# Altium PCB TabletDesign.PcbDoc (part 3 of 3)
Units mm, origin at the board's own origin, x right, y up, seen from the top; angles counter-clockwise.
Board outline 140 x 100 mm, 2 copper layers (Top Layer, Bottom Layer); 256 components, 248 nets, 1066 pads, 0 vias.
Unrouted connection lines stored in the file: 625.
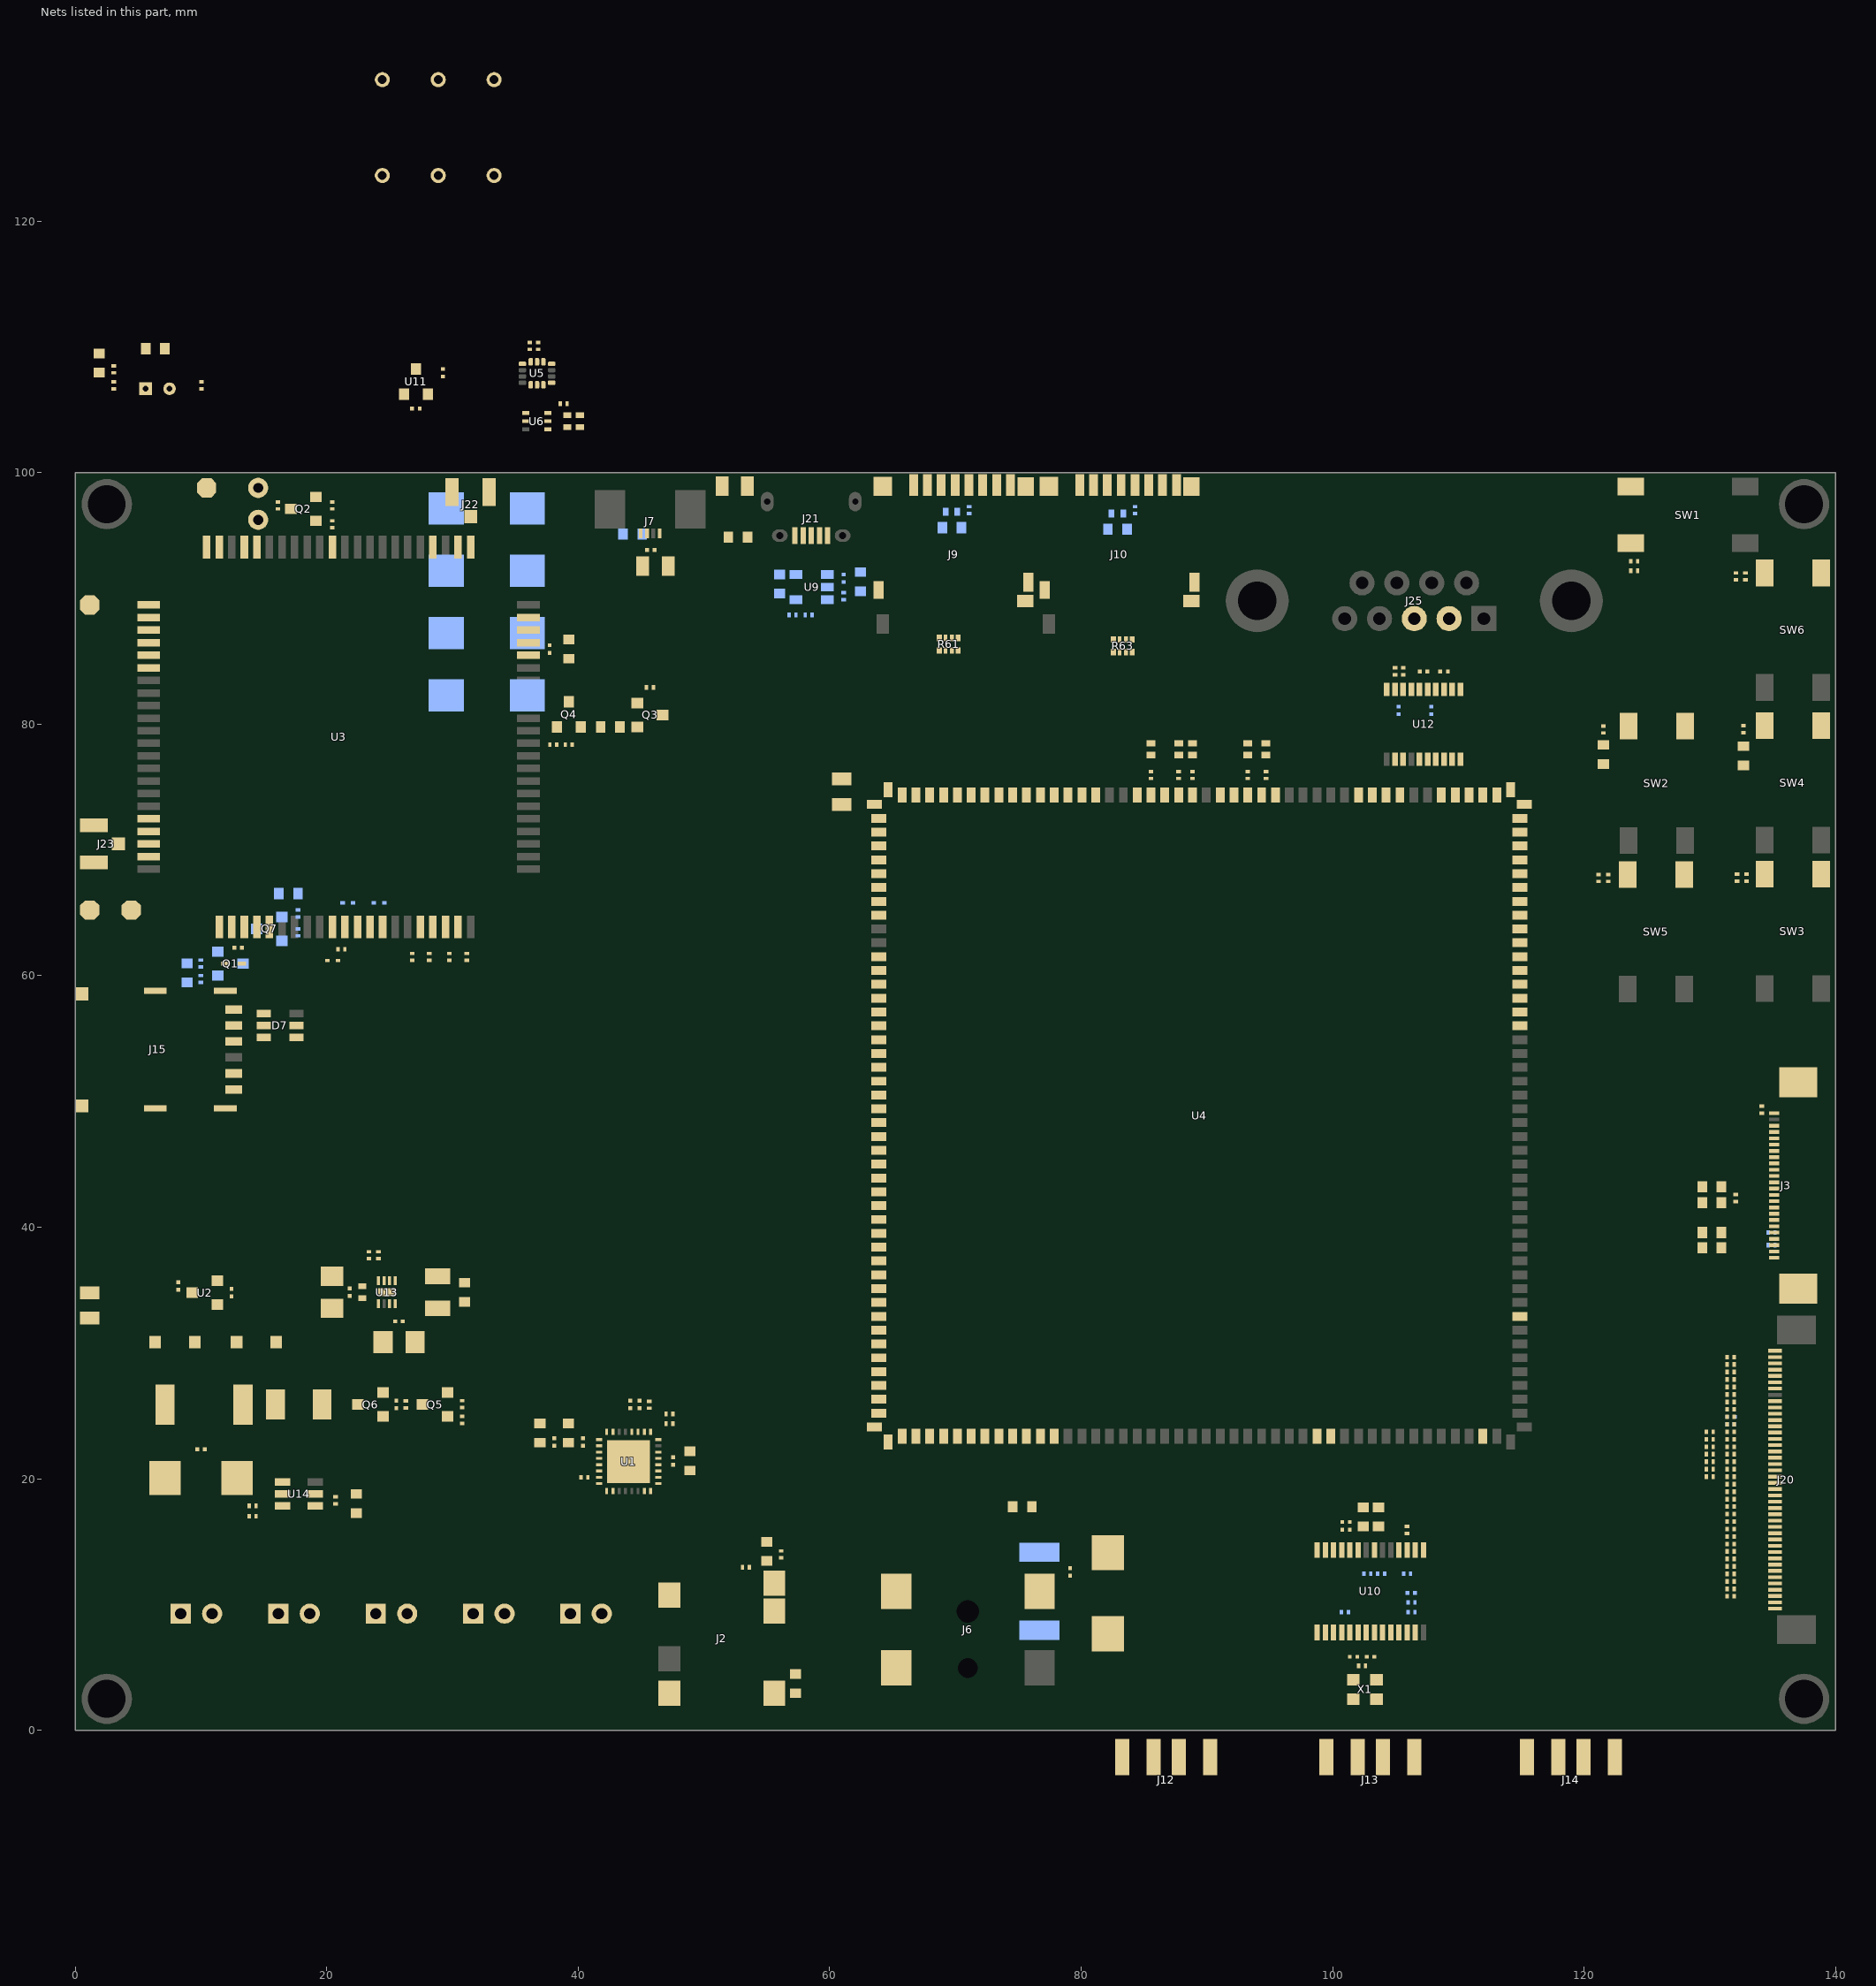
[diagram p2: the nets of this part, all layers, seen from the top]

## Part data (continued)
R1 R3 R71: library part RC0201JR-07680RL, "RES SMD 680 OHM 5% 1/20W 0201", Case Code (Imperial)=0201, Case Code (Metric)=0603, Manufacturer=Yageo, Max Operating Temperature=125°C, Max Power Dissipation=50mW, Min Operating Temperature=-55°C, Resistance Tolerance=5%, Resistor Type="Thick Film", Supplier Part Number 1=311-680NCT-ND, Temperature Coefficient=200ppm/°C, Voltage Rating=25V, Case/Package=0201, Category="Chip SMD Resistors", ComponentLink1Description=https://datasheet.ciiva.com/8884/pyu-rc0201-51-rohs-l-8-8884997.pdf?src-supplier=Avnet, ComponentLink1URL=https://datasheet.ciiva.com/8884/pyu-rc0201-51-rohs-l-8-8884997.pdf?src-supplier=Avnet, ComponentLink2Description=https://datasheet.ciiva.com/28388/pyu-rc0201-51-rohs-l-8-28388585.pdf?src-supplier=Avnet+Europe, ComponentLink2URL=https://datasheet.ciiva.com/28388/pyu-rc0201-51-rohs-l-8-28388585.pdf?src-supplier=Avnet+Europe, ComponentLink3Description=https://datasheet.ciiva.com/7672/1563626-7672300.pdf?src-supplier=Element14, ComponentLink3URL=https://datasheet.ciiva.com/7672/1563626-7672300.pdf?src-supplier=Element14, ComponentLink4Description=https://datasheet.ciiva.com/7672/1563626-7672299.pdf?src-supplier=Element14, ComponentLink4URL=https://datasheet.ciiva.com/7672/1563626-7672299.pdf?src-supplier=Element14, ComponentLink5Description=https://datasheet.ciiva.com/16855/pyu-rc0201-51-rohs-l-8-16855612.pdf?src-supplier=Avnet+Europe, ComponentLink5URL=https://datasheet.ciiva.com/16855/pyu-rc0201-51-rohs-l-8-16855612.pdf?src-supplier=Avnet+Europe, Construction=Rectangular, Contact Plating=Tin,Matte, Depth=0.3mm, Features="Moisture Resistant", Length=0.6mm, Manufacturer Part Number=RC0201JR-07680RL, Military Standard=Not, Number of Pins=2, Number of Terminations=2, Packaging="Cut Tape", Power Rating=50mW, Pricing 1="1=0.10000, 10=0.02800, 100=0.01140, 1000=0.00513, 2500=0.00445, 5000=0.00368 (USD)", Radiation Hardening=No, REACH SVHC="No SVHC", Resistance=680R, RoHS=Yes, RoHS Compliant=Yes, Series=RC, Stock 1=10382, Supplier 1=Digi-Key, Tolerance=5%, Voltage Rating (DC)=25V, Width=0.3mm
R2: library part RC0201FR-075K6L, "RES SMD 5.6K OHM 1% 1/20W 0201", Case Code (Imperial)=0201, Case Code (Metric)=0603, Manufacturer=Yageo, Max Operating Temperature=125°C, Max Power Dissipation=50mW, Min Operating Temperature=-55°C, Package Quantity=10000, Resistance=5.6kR, Resistance Tolerance=1%, Resistor Type="Thick Film", Supplier Part Number 1=YAG2346CT-ND, Temperature Coefficient=200ppm/°C, Voltage Rating=25V, Case/Package=0201, Category="Chip SMD Resistors", ComponentLink1Description=https://datasheet.ciiva.com/22661/1563626-22661325.pdf?src-supplier=Element14, ComponentLink1URL=https://datasheet.ciiva.com/22661/1563626-22661325.pdf?src-supplier=Element14, Features="Moisture Resistant", Height=0.01inch, Length=0.024inch, Manufacturer Part Number=RC0201FR-075K6L, Number of Terminations=2, Packaging="Tape and Reel", Power Rating=50mW, Pricing 1="1=0.10000, 10=0.04000, 100=0.01630, 1000=0.00732, 2500=0.00635, 5000=0.00525 (USD)", REACH SVHC="No SVHC", RoHS=Yes, RoHS Compliant=Yes, Series=RC, Stock 1=2, Supplier 1=Digi-Key, Termination=SMD/SMT, Tolerance=1%, Width=0.012inch
R4 R5 R25 R26 R29 R30 R32 R33 R35 R37 R60 R62 R83 R84 R117 R119: library part AC0201FR-07100RL, "RES SMD 100 OHM 1% 1/20W 0201", Case Code (Imperial)=0201, Case Code (Metric)=0603, Manufacturer=Yageo, Max Operating Temperature=155°C, Max Power Dissipation=50mW, Min Operating Temperature=-55°C, Resistor Type="Thick Film", Supplier Part Number 1=YAG3412CT-ND, Temperature Coefficient=200ppm/°C, Tolerance=1%, Case/Package=0201, Category="Chip SMD Resistors", ComponentLink1Description=http://www.yageo.com/NewPortal/yageodocoutput?fileName=/pdf/R-Chip/PYu-AC_51_RoHS_L_6.pdf&src-supplier=Digi-Key, ComponentLink1URL=http://www.yageo.com/NewPortal/yageodocoutput?fileName=/pdf/R-Chip/PYu-AC_51_RoHS_L_6.pdf&src-supplier=Digi-Key, Features="Moisture Resistant,Automotive AEC-Q200", Height=0.01inch, Length=0.024inch, Manufacturer Part Number=AC0201FR-07100RL, Number of Terminations=2, Packaging="Tape and Reel", Pricing 1="1=0.10000, 10=0.06300, 100=0.02560, 1000=0.01149, 2500=0.00997, 5000=0.00823 (USD)", Resistance=100R, RoHS=Yes, RoHS Compliant=Yes, Stock 1=124190, Supplier 1=Digi-Key, Width=0.012inch
R6 R24 R81: library part RC0201JR-070RL, "RES SMD 0 OHM JUMPER 1/20W 0201"
R7 R8 R9 R15 R17 R28 R31 R34 R36 R39 R69 R74 R89 R91 R93 R95 R97 R99 R101 R103 R131: library part RC0201FR-0710KL, "RES SMD 10K OHM 1% 1/20W 0201", Case Code (Imperial)=0201, Case Code (Metric)=0603, Manufacturer=Yageo, Max Operating Temperature=125°C, Max Power Dissipation=50mW, Min Operating Temperature=-55°C, Package Quantity=1, Resistance=10kR, Supplier Part Number 1=311-10.0KMCT-ND, Temperature Coefficient=200ppm/°C, Tolerance=1%, Voltage Rating=25V, Case/Package=0201, ComponentLink1Description=http://www.yageo.com/documents/recent/PYu-RC_Group_51_RoHS_L_10.pdf?src-supplier=Digi-Key, ComponentLink1URL=http://www.yageo.com/documents/recent/PYu-RC_Group_51_RoHS_L_10.pdf?src-supplier=Digi-Key, ComponentLink2Description=http://www.farnell.com/datasheets/2167052.pdf?src-supplier=Element14, ComponentLink2URL=http://www.farnell.com/datasheets/2167052.pdf?src-supplier=Element14, ComponentLink3Description=http://www.yageo.com/documents/recent/PYu-RC0201_51_RoHS_L_8.pdf?src-supplier=Avnet, ComponentLink3URL=http://www.yageo.com/documents/recent/PYu-RC0201_51_RoHS_L_8.pdf?src-supplier=Avnet, ComponentLink4Description=http://www.yageo.com/documents/recent/PYu-RC0201_51_RoHS_L_8.pdf?src-supplier=Avnet+Europe, ComponentLink4URL=http://www.yageo.com/documents/recent/PYu-RC0201_51_RoHS_L_8.pdf?src-supplier=Avnet+Europe, ComponentLink5Description=https://www.verical.com/server-webapp/html/getDatasheet?partID=421074&src-supplier=Verical, ComponentLink5URL=https://www.verical.com/server-webapp/html/getDatasheet?partID=421074&src-supplier=Verical, ComponentLink6Description=http://www.farnell.com/datasheets/1421516.pdf?src-supplier=Element14, ComponentLink6URL=http://www.farnell.com/datasheets/1421516.pdf?src-supplier=Element14, Composition="Thick Film", Contact Plating=Tin,Matte, Depth=0.3mm, Features="Moisture Resistant", Height=0.01inch, Lead Free="Lead Free", Length=0.6mm, Manufacturer Part Number=RC0201FR-0710KL, Military Standard=Not, Number of Pins=2, Number of Terminations=2, Packaging="Tape and Reel", Power Rating=50mW, Pricing 1="1=0.1, 10=0.042, 100=0.0171, 1000=0.00768, 2500=0.00666, 5000=0.00551 (USD)", Radiation Hardening=No, REACH SVHC="No SVHC", Stock 1=12729696, Supplier 1=Digi-Key, Termination=SMD/SMT, Voltage Rating (DC)=25V, Weight=6E-06oz, Width=0.3mm, Working Voltage=25V
R11 R16 R70 R135: library part RC0201JR-0747KL, "RES SMD 47K OHM 5% 1/20W 0201", Case Code (Imperial)=0201, Case Code (Metric)=0603, Manufacturer=Yageo, Max Operating Temperature=125°C, Max Power Dissipation=50mW, Min Operating Temperature=-55°C, Package Quantity=10000, Resistance=47kR, Resistance Tolerance=5%, Resistor Type="Thick Film", Supplier Part Number 1=311-47KNCT-ND, Temperature Coefficient=200ppm/°C, Voltage Rating=25V, Case/Package=0201, Category="Chip SMD Resistors", ComponentLink1Description=https://datasheet.ciiva.com/2492/pyu-r-int-thick-7-2492966.pdf?src-supplier=Digi-Key, ComponentLink1URL=https://datasheet.ciiva.com/2492/pyu-r-int-thick-7-2492966.pdf?src-supplier=Digi-Key, ComponentLink2Description=https://datasheet.ciiva.com/5989/1563626-5989624.pdf?src-supplier=Farnell, ComponentLink2URL=https://datasheet.ciiva.com/5989/1563626-5989624.pdf?src-supplier=Farnell, ComponentLink3Description=https://datasheet.ciiva.com/28399/pyu-rc0201-51-rohs-l-8-28399338.pdf?src-supplier=Avnet+Europe, ComponentLink3URL=https://datasheet.ciiva.com/28399/pyu-rc0201-51-rohs-l-8-28399338.pdf?src-supplier=Avnet+Europe, ComponentLink4Description=https://datasheet.ciiva.com/8889/pyu-rc0201-51-rohs-l-8-8889071.pdf?src-supplier=Avnet, ComponentLink4URL=https://datasheet.ciiva.com/8889/pyu-rc0201-51-rohs-l-8-8889071.pdf?src-supplier=Avnet, ComponentLink5Description=https://datasheet.ciiva.com/2492/pyu-r-int-thick-7-2492965.pdf?src-supplier=Digi-Key, ComponentLink5URL=https://datasheet.ciiva.com/2492/pyu-r-int-thick-7-2492965.pdf?src-supplier=Digi-Key, ComponentLink6Description=https://datasheet.ciiva.com/2492/pyu-r-int-thick-7-2492967.pdf?src-supplier=Digi-Key, ComponentLink6URL=https://datasheet.ciiva.com/2492/pyu-r-int-thick-7-2492967.pdf?src-supplier=Digi-Key, ComponentLink7Description=https://datasheet.ciiva.com/16855/pyu-rc0201-51-rohs-l-8-16855517.pdf?src-supplier=Avnet+Europe, ComponentLink7URL=https://datasheet.ciiva.com/16855/pyu-rc0201-51-rohs-l-8-16855517.pdf?src-supplier=Avnet+Europe, Construction=Rectangular, Contact Plating=Tin,Matte, Depth=0.3mm, Features="Moisture Resistant", Height=0.01inch, Lead Free="Lead Free", Length=0.6mm, Manufacturer Part Number=RC0201JR-0747KL, Military Standard=Not, Number of Pins=2, Number of Terminations=2, Packaging="Tape and Reel", Power Rating=50mW, Pricing 1="1=0.10000, 10=0.02800, 100=0.01140, 1000=0.00513, 2500=0.00445, 5000=0.00368 (USD)", Radiation Hardening=No, REACH SVHC="No SVHC", RoHS=Yes, RoHS Compliant=Yes, Series=RC, Stock 1=472205, Supplier 1=Digi-Key, Technology="THICK FILM", Termination=SMD/SMT, Tolerance=5%, Voltage Rating (DC)=25V, Width=0.3mm, Working Voltage=25V
R13 R134: library part RMCF0201FT4K70, "RES 4.7K OHM 1% 1/20W 0201", Case Code (Imperial)=0201, Case Code (Metric)=0603, Manufacturer="Stackpole Electronics", Max Operating Temperature=125°C, Max Power Dissipation=50mW, Min Operating Temperature=-55°C, Resistance=4.7kR, Resistor Type="Thick Film", Supplier Part Number 1=RMCF0201FT4K70CT-ND, Temperature Coefficient=200ppm/°C, Tolerance=1%, Case/Package=0201, Category="Chip SMD Resistors", ComponentLink1Description=https://www.seielect.com/catalog/SEI-Packaging.pdf?src-supplier=Digi-Key, ComponentLink1URL=https://www.seielect.com/catalog/SEI-Packaging.pdf?src-supplier=Digi-Key, ComponentLink2Description=https://www.seielect.com/catalog/SEI-RMCF_RMCP.pdf?src-supplier=Avnet, ComponentLink2URL=https://www.seielect.com/catalog/SEI-RMCF_RMCP.pdf?src-supplier=Avnet, Contact Plating=Tin,Matte, Height=0.009inch, Length=0.024inch, Manufacturer Part Number=RMCF0201FT4K70, Mount="Surface Mount", Number of Terminations=2, Packaging="Tape and Reel", Pricing 1="1=0.10000, 10=0.02300, 100=0.00940, 1000=0.00424, 2500=0.00368, 5000=0.00304 (USD)", Radiation Hardening=No, RoHS=Yes, Stock 1=325193, Supplier 1=Digi-Key, Width=0.012inch
R14: library part ERJ-1GNJ301C, "RES SMD 300 OHM 5% 1/20W 0201", Case Code (Imperial)=0201, Case Code (Metric)=0603, Manufacturer=Panasonic, Max Operating Temperature=125°C, Max Power Dissipation=50mW, Min Operating Temperature=-55°C, Package Quantity=15000, Resistor Type="Thick Film", Supplier Part Number 1=P123298CT-ND, Temperature Coefficient=200ppm/°C, Tolerance=5%, Voltage Rating=25V, Case/Package=0201, Category="Chip SMD Resistors", ComponentLink1Description=http://www.mouser.com/ds/2/315/AOA0000C84-947596.pdf?src-supplier=Mouser, ComponentLink1URL=http://www.mouser.com/ds/2/315/AOA0000C84-947596.pdf?src-supplier=Mouser, ComponentLink2Description=http://www.onlinecomponents.com/datasheet/erj-1gnj301c.aspx?p=44467777&src-supplier=Onlinecomponents.com, ComponentLink2URL=http://www.onlinecomponents.com/datasheet/erj-1gnj301c.aspx?p=44467777&src-supplier=Onlinecomponents.com, ComponentLink3Description=https://industrial.panasonic.com/cdbs/www-data/pdf/RDM0000/DMM0000COL11.pdf?src-supplier=Digi-Key, ComponentLink3URL=https://industrial.panasonic.com/cdbs/www-data/pdf/RDM0000/DMM0000COL11.pdf?src-supplier=Digi-Key, ComponentLink4Description=https://b2b-api.panasonic.eu/file_stream/pids/fileversion/1242?src-supplier=Digi-Key, ComponentLink4URL=https://b2b-api.panasonic.eu/file_stream/pids/fileversion/1242?src-supplier=Digi-Key, ComponentLink5Description=http://industrial.panasonic.com/www-cgi/jvcr13pz.cgi?E+PZ+3+AOA0002+ERJ1GNJ301C+7+WW?src-supplier=Digi-Key, ComponentLink5URL=http://industrial.panasonic.com/www-cgi/jvcr13pz.cgi?E+PZ+3+AOA0002+ERJ1GNJ301C+7+WW?src-supplier=Digi-Key, Contact Plating=Tin, Height=0.01inch, Length=0.024inch, Manufacturer Part Number=ERJ-1GNJ301C, Mount="Surface Mount", Number of Terminations=2, Packaging="Tape and Reel", Power Rating=50mW, Pricing 1="1=0.10000, 10=0.02800, 100=0.01150, 1000=0.00518, 2500=0.00450, 5000=0.00371 (USD)", Resistance=300R, RoHS=Yes, Stock 1=65293, Supplier 1=Digi-Key, Termination=SMD/SMT, Weight=6E-06oz, Width=0.012inch
R18 R68 R73 R128 R130 R133: library part RC0201JR-07100KL, "RES SMD 100K OHM 5% 1/20W 0201"
R19 R132: library part AC0201FR-075K1L, "RES SMD 5.1K OHM 1% 1/20W 0201", Case/Package=0201, Manufacturer=Yageo, Max Operating Temperature=155°C, Max Power Dissipation=50mW, Min Operating Temperature=-55°C, Resistance=5.1kR, Resistor Type="Thick Film", Supplier Part Number 1=YAG5228CT-ND, Temperature Coefficient=200ppm/°C, Tolerance=1%, Category="Chip SMD Resistors", ComponentLink1Description=http://www.yageo.com/NewPortal/yageodocoutput?fileName=/pdf/R-Chip/PYu-AC_51_RoHS_L_6.pdf&src-supplier=Digi-Key, ComponentLink1URL=http://www.yageo.com/NewPortal/yageodocoutput?fileName=/pdf/R-Chip/PYu-AC_51_RoHS_L_6.pdf&src-supplier=Digi-Key, ComponentLink2Description=http://www.yageo.com/NewPortal/yageodocoutput?fileName=/pdf/R-Chip/PYu-AC_51_RoHS_L_5.pdf&src-supplier=Digi-Key, ComponentLink2URL=http://www.yageo.com/NewPortal/yageodocoutput?fileName=/pdf/R-Chip/PYu-AC_51_RoHS_L_5.pdf&src-supplier=Digi-Key, Features="Moisture Resistant,Automotive AEC-Q200", Height=0.01inch, Length=0.024inch, Manufacturer Part Number=AC0201FR-075K1L, Number of Terminations=2, Packaging="Tape and Reel", Pricing 1="1=0.10000, 10=0.06300, 100=0.02560, 1000=0.01149, 2500=0.00997, 5000=0.00823 (USD)", RoHS=Yes, RoHS Compliant=Yes, Stock 1=2998, Supplier 1=Digi-Key, Width=0.012inch
R20 R21 R22 R23 R82: library part RC0201JR-07470RL, "RES SMD 470 OHM 5% 1/20W 0201", Case Code (Imperial)=0201, Case Code (Metric)=0603, Manufacturer=Yageo, Max Operating Temperature=125°C, Max Power Dissipation=50mW, Min Operating Temperature=-55°C, Package Quantity=1, Supplier Part Number 1=311-470NCT-ND, Temperature Coefficient=200ppm/°C, Tolerance=5%, Voltage Rating=25V, Case/Package=0201, ComponentLink1Description=http://www.farnell.com/datasheets/443682.pdf?src-supplier=Farnell, ComponentLink1URL=http://www.farnell.com/datasheets/443682.pdf?src-supplier=Farnell, ComponentLink2Description=http://www.yageo.com/documents/recent/PYu-RC0201_51_RoHS_L_8.pdf?src-supplier=Avnet, ComponentLink2URL=http://www.yageo.com/documents/recent/PYu-RC0201_51_RoHS_L_8.pdf?src-supplier=Avnet, ComponentLink3Description=http://www.yageo.com/documents/recent/PYu-RC_Group_51_RoHS_L_9.pdf?src-supplier=Digi-Key, ComponentLink3URL=http://www.yageo.com/documents/recent/PYu-RC_Group_51_RoHS_L_9.pdf?src-supplier=Digi-Key, ComponentLink4Description=http://www.yageo.com/documents/recent/PYu-RC_Group_51_RoHS_L_10.pdf?src-supplier=Digi-Key, ComponentLink4URL=http://www.yageo.com/documents/recent/PYu-RC_Group_51_RoHS_L_10.pdf?src-supplier=Digi-Key, ComponentLink5Description=http://www.yageo.com.tw/exep/pages/download/literatures/PYu-R_INT-thick_7.pdf?src-supplier=Digi-Key, ComponentLink5URL=http://www.yageo.com.tw/exep/pages/download/literatures/PYu-R_INT-thick_7.pdf?src-supplier=Digi-Key, ComponentLink6Description=http://www.yageo.com/documents/recent/PYu-RC0201_51_RoHS_L_8.pdf?src-supplier=Avnet+Europe, ComponentLink6URL=http://www.yageo.com/documents/recent/PYu-RC0201_51_RoHS_L_8.pdf?src-supplier=Avnet+Europe, Composition="Thick Film", Contact Plating=Tin,Matte, Depth=0.3mm, Features="Moisture Resistant", Height=0.01inch, Lead Free="Lead Free", Length=0.6mm, Manufacturer Part Number=RC0201JR-07470RL, Military Standard=Not, Number of Pins=2, Number of Terminations=2, Packaging="Tape and Reel", Power Rating=50mW, Pricing 1="1=0.1, 10=0.028, 100=0.0115, 1000=0.00517, 2500=0.00448, 5000=0.00371 (USD)", Radiation Hardening=No, REACH SVHC="No SVHC", Resistance=470R, Stock 1=101994, Supplier 1=Digi-Key, Termination=SMD/SMT, Voltage Rating (DC)=25V, Width=0.3mm
R27: library part AC0201FR-0733RL, "RES SMD 33 OHM 1% 1/20W 0201", Case Code (Imperial)=0201, Case Code (Metric)=0603, Manufacturer=Yageo, Max Operating Temperature=155°C, Max Power Dissipation=50mW, Min Operating Temperature=-55°C, Resistor Type="Thick Film", Supplier Part Number 1=YAG3424CT-ND, Temperature Coefficient=200ppm/°C, Tolerance=1%, Case/Package=0201, Category="Chip SMD Resistors", ComponentLink1Description=http://www.yageo.com/NewPortal/yageodocoutput?fileName=/pdf/R-Chip/PYu-AC_51_RoHS_L_6.pdf&src-supplier=Digi-Key, ComponentLink1URL=http://www.yageo.com/NewPortal/yageodocoutput?fileName=/pdf/R-Chip/PYu-AC_51_RoHS_L_6.pdf&src-supplier=Digi-Key, Features="Moisture Resistant,Automotive AEC-Q200", Height=0.01inch, Length=0.024inch, Manufacturer Part Number=AC0201FR-0733RL, Number of Terminations=2, Packaging="Tape and Reel", Pricing 1="1=0.10000, 10=0.06300, 100=0.02560, 1000=0.01149, 2500=0.00997, 5000=0.00823 (USD)", Resistance=33R, RoHS=Yes, RoHS Compliant=Yes, Stock 1=119363, Supplier 1=Digi-Key, Width=0.012inch
R38 R40: library part AC0201JR-072K2L, "RES SMD 2.2K OHM 5% 1/20W 0201", Case Code (Imperial)=0201, Case Code (Metric)=0603, Manufacturer=Yageo, Max Operating Temperature=155°C, Max Power Dissipation=50mW, Min Operating Temperature=-55°C, Resistance=2.2kR, Resistor Type="Thick Film", Supplier Part Number 1=YAG3433CT-ND, Temperature Coefficient=200ppm/°C, Tolerance=5%, Case/Package=0201, Category="Chip SMD Resistors", ComponentLink1Description=http://www.yageo.com/NewPortal/yageodocoutput?fileName=/pdf/R-Chip/PYu-AC_51_RoHS_L_6.pdf&src-supplier=Digi-Key, ComponentLink1URL=http://www.yageo.com/NewPortal/yageodocoutput?fileName=/pdf/R-Chip/PYu-AC_51_RoHS_L_6.pdf&src-supplier=Digi-Key, Features="Moisture Resistant,Automotive AEC-Q200", Height=0.01inch, Length=0.024inch, Manufacturer Part Number=AC0201JR-072K2L, Number of Terminations=2, Packaging="Tape and Reel", Pricing 1="1=0.10000, 10=0.04700, 100=0.01910, 1000=0.00860, 2500=0.00746, 5000=0.00617 (USD)", RoHS=Yes, RoHS Compliant=Yes, Stock 1=106991, Supplier 1=Digi-Key, Width=0.012inch
R61 R63: library part CAY10-473J4LF, "RES ARRAY 4 RES 47K OHM 0804", Case Code (Imperial)=0804, Case Code (Metric)=2010, Manufacturer=Bourns, Max Operating Temperature=125°C, Min Operating Temperature=-55°C, Number of Resistors=4, Package Quantity=1, Power Per Element=62.5mW, Power Rating=125mW, Resistance=47kR, Resistance Tolerance=5%, Supplier Part Number 1=CAY10-473J4LFCT-ND, Temperature Coefficient=250ppm/°C, Voltage Rating=25V, Case/Package=0804, Category="Resistor Arrays", Circuit Type=Isolated, ComponentLink1Description=https://datasheet.ciiva.com/11807/0900766b8064e463-11807137.pdf?src-supplier=RSComponents, ComponentLink1URL=https://datasheet.ciiva.com/11807/0900766b8064e463-11807137.pdf?src-supplier=RSComponents, ComponentLink2Description=https://datasheet.ciiva.com/6494/cay10-6494182.pdf?src-supplier=Digi-Key, ComponentLink2URL=https://datasheet.ciiva.com/6494/cay10-6494182.pdf?src-supplier=Digi-Key, ComponentLink3Description=https://datasheet.ciiva.com/16965/cay10-16965867.pdf?src-supplier=Avnet+Europe, ComponentLink3URL=https://datasheet.ciiva.com/16965/cay10-16965867.pdf?src-supplier=Avnet+Europe, ComponentLink4Description=https://datasheet.ciiva.com/22712/467939-22712716.pdf?src-supplier=Element14, ComponentLink4URL=https://datasheet.ciiva.com/22712/467939-22712716.pdf?src-supplier=Element14, ComponentLink5Description=https://datasheet.ciiva.com/6494/cay10-6494183.pdf?src-supplier=Digi-Key, ComponentLink5URL=https://datasheet.ciiva.com/6494/cay10-6494183.pdf?src-supplier=Digi-Key, ComponentLink6Description=https://datasheet.ciiva.com/6494/cay10-6494184.pdf?src-supplier=Digi-Key, ComponentLink6URL=https://datasheet.ciiva.com/6494/cay10-6494184.pdf?src-supplier=Digi-Key, ComponentLink7Description=https://datasheet.ciiva.com/8370/cay10-8370974.pdf?src-supplier=Avnet, ComponentLink7URL=https://datasheet.ciiva.com/8370/cay10-8370974.pdf?src-supplier=Avnet, ComponentLink8Description=https://datasheet.ciiva.com/48692/001055368-da-01-en-wid-arr-cay10-473j4lf-47k-ohm-4-w-0804-48692103.pdf?src-supplier=Conrad, ComponentLink8URL=https://datasheet.ciiva.com/48692/001055368-da-01-en-wid-arr-cay10-473j4lf-47k-ohm-4-w-0804-48692103.pdf?src-supplier=Conrad, Contact Plating=Tin, Depth=1mm, Height=0.018inch, Length=2mm, Manufacturer Part Number=CAY10-473J4LF, Military Standard=Not, Mount="Surface Mount", Number of Elements=4, Number of Pins=8, Number of Terminals/Pins=8, Packaging="Tape and Reel", Pricing 1="1=0.12000, 10=0.10400, 25=0.07200, 50=0.05600, 100=0.04000, 250=0.03120, 500=0.02480, 1000=0.01760, 5000=0.01360 (USD)", REACH SVHC="No SVHC", RoHS=Yes, RoHS Compliant=Yes, Series=CAY10, Stock 1=11037, Supplier 1=Digi-Key, Technology="THICK FILM", Terminal Pitch=0.5mm, Termination=Convex, Tolerance=5%, Voltage Rating (DC)=25V, Width=0.039inch
R66: library part AC0201FR-076K8L, "RES SMD 6.8K OHM 1% 1/20W 0201", Case/Package=0201, Manufacturer=Yageo, Max Operating Temperature=155°C, Max Power Dissipation=50mW, Min Operating Temperature=-55°C, Resistance=6.8kR, Resistor Type="Thick Film", Supplier Part Number 1=YAG5238CT-ND, Temperature Coefficient=200ppm/°C, Tolerance=1%, Category="Chip SMD Resistors", ComponentLink1Description=http://www.yageo.com/NewPortal/yageodocoutput?fileName=/pdf/R-Chip/PYu-AC_51_RoHS_L_6.pdf&src-supplier=Digi-Key, ComponentLink1URL=http://www.yageo.com/NewPortal/yageodocoutput?fileName=/pdf/R-Chip/PYu-AC_51_RoHS_L_6.pdf&src-supplier=Digi-Key, ComponentLink2Description=http://www.yageo.com/NewPortal/yageodocoutput?fileName=/pdf/R-Chip/PYu-AC_51_RoHS_L_5.pdf&src-supplier=Digi-Key, ComponentLink2URL=http://www.yageo.com/NewPortal/yageodocoutput?fileName=/pdf/R-Chip/PYu-AC_51_RoHS_L_5.pdf&src-supplier=Digi-Key, Features="Moisture Resistant,Automotive AEC-Q200", Height=0.01inch, Length=0.024inch, Manufacturer Part Number=AC0201FR-076K8L, Number of Terminations=2, Packaging="Tape and Reel", Pricing 1="1=0.10000, 10=0.06300, 100=0.02560, 1000=0.01149, 2500=0.00997, 5000=0.00823 (USD)", RoHS=Yes, RoHS Compliant=Yes, Stock 1=17901, Supplier 1=Digi-Key, Width=0.012inch
R67: library part RC0201FR-071KL, "RES SMD 1K OHM 1% 1/20W 0201", Case Code (Imperial)=0201, Case Code (Metric)=0603, Manufacturer=Yageo, Max Operating Temperature=125°C, Max Power Dissipation=50mW, Min Operating Temperature=-55°C, Package Quantity=10000, Resistance=1kR, Supplier Part Number 1=311-1KMCT-ND, Temperature Coefficient=200ppm/°C, Tolerance=1%, Voltage Rating=25V, Case/Package=0201, ComponentLink1Description=http://www.yageo.com/documents/recent/PYu-RC0201_51_RoHS_L_8.pdf?src-supplier=Avnet+Europe, ComponentLink1URL=http://www.yageo.com/documents/recent/PYu-RC0201_51_RoHS_L_8.pdf?src-supplier=Avnet+Europe, ComponentLink2Description=http://www.farnell.com/datasheets/2167052.pdf?src-supplier=Element14, ComponentLink2URL=http://www.farnell.com/datasheets/2167052.pdf?src-supplier=Element14, ComponentLink3Description=http://www.yageo.com/documents/recent/PYu-RC_Group_51_RoHS_L_10.pdf?src-supplier=Digi-Key, ComponentLink3URL=http://www.yageo.com/documents/recent/PYu-RC_Group_51_RoHS_L_10.pdf?src-supplier=Digi-Key, ComponentLink4Description=http://www.yageo.com/documents/recent/PYu-RC0201_51_RoHS_L_8.pdf?src-supplier=Avnet, ComponentLink4URL=http://www.yageo.com/documents/recent/PYu-RC0201_51_RoHS_L_8.pdf?src-supplier=Avnet, Composition="Thick Film", Contact Plating=Tin,Matte, Depth=0.3mm, Features="Moisture Resistant", Height=0.01inch, Lead Free="Lead Free", Length=0.024inch, Manufacturer Part Number=RC0201FR-071KL, Military Standard=Not, Number of Terminations=2, Packaging="Tape and Reel", Power Rating=50mW, Pricing 1="1=0.1, 10=0.04, 100=0.0165, 1000=0.00739, 2500=0.00642, 5000=0.0053 (USD)", Radiation Hardening=No, REACH SVHC=Unknown, Stock 1=3437969, Supplier 1=Digi-Key, Termination=SMD/SMT, Width=0.012inch, Working Voltage=25V
R72: library part RC0201FR-07510KL, "RES SMD 510K OHM 1% 1/20W 0201", Case Code (Imperial)=0201, Case Code (Metric)=0603, Manufacturer=Yageo, Max Operating Temperature=125°C, Max Power Dissipation=50mW, Min Operating Temperature=-55°C, Resistance=510kR, Resistor Type="Thick Film", Supplier Part Number 1=YAG2713CT-ND, Temperature Coefficient=200ppm/°C, Tolerance=1%, Case/Package=0201, Category="Chip SMD Resistors", ComponentLink1Description=http://components.arrow.com/part/dataview/0323_03301050?src-supplier=Arrow+Europe, ComponentLink1URL=http://components.arrow.com/part/dataview/0323_03301050?src-supplier=Arrow+Europe, ComponentLink2Description=http://www.yageo.com.tw/exep/pages/download/literatures/PYu-R_INT-thick_7.pdf?src-supplier=Digi-Key, ComponentLink2URL=http://www.yageo.com.tw/exep/pages/download/literatures/PYu-R_INT-thick_7.pdf?src-supplier=Digi-Key, ComponentLink3Description=http://www.yageo.com/documents/recent/PYu-RC_Group_51_RoHS_L_9.pdf?src-supplier=Digi-Key, ComponentLink3URL=http://www.yageo.com/documents/recent/PYu-RC_Group_51_RoHS_L_9.pdf?src-supplier=Digi-Key, Depth=0.3mm, Features="Moisture Resistant", Height=0.01inch, Lead Free="Lead Free", Length=0.024inch, Manufacturer Part Number=RC0201FR-07510KL, Military Standard=Not, Number of Terminations=2, Packaging="Tape and Reel", Pricing 1="1=0.10000, 10=0.04000, 100=0.01630, 1000=0.00732, 2500=0.00635, 5000=0.00525 (USD)", RoHS=Yes, RoHS Compliant=Yes, Stock 1=1654, Supplier 1=Digi-Key, Width=0.012inch
R75: library part RC0201FR-0720KL, "RES SMD 20K OHM 1% 1/20W 0201", Case Code (Imperial)=0201, Case Code (Metric)=0603, Manufacturer=Yageo, Max Operating Temperature=125°C, Max Power Dissipation=50mW, Min Operating Temperature=-55°C, Package Quantity=10000, Resistance=20kR, Supplier Part Number 1=YAG2276CT-ND, Temperature Coefficient=200ppm/°C, Tolerance=1%, Voltage Rating=25V, Case/Package=0201, ComponentLink1Description=http://www.yageo.com.tw/exep/pages/download/literatures/PYu-R_INT-thick_7.pdf?src-supplier=Digi-Key, ComponentLink1URL=http://www.yageo.com.tw/exep/pages/download/literatures/PYu-R_INT-thick_7.pdf?src-supplier=Digi-Key, Composition="Thick Film", Depth=0.3mm, Features="Moisture Resistant", Height=0.01inch, Lead Free="Lead Free", Length=0.024inch, Manufacturer Part Number=RC0201FR-0720KL, Military Standard=Not, Number of Terminations=2, Packaging="Tape and Reel", Power Rating=50mW, Pricing 1="1=0.1, 10=0.042, 100=0.0171, 1000=0.00768, 2500=0.00666, 5000=0.00551 (USD)", Stock 1=1339619, Supplier 1=Digi-Key, Termination=SMD/SMT, Width=0.012inch
R76: library part RC0201JR-071M1L, "RES SMD 1.1M OHM 5% 1/20W 0201", Case Code (Imperial)=0201, Case Code (Metric)=0603, Manufacturer=Yageo, Max Operating Temperature=125°C, Max Power Dissipation=50mW, Min Operating Temperature=-55°C, Resistance=1.1MR, Resistor Type="Thick Film", Supplier Part Number 1=YAG2868CT-ND, Temperature Coefficient=200ppm/°C, Tolerance=5%, Case/Package=0201, Category="Chip SMD Resistors", ComponentLink1Description=http://www.yageo.com.tw/exep/pages/download/literatures/PYu-R_INT-thick_7.pdf?src-supplier=Digi-Key, ComponentLink1URL=http://www.yageo.com.tw/exep/pages/download/literatures/PYu-R_INT-thick_7.pdf?src-supplier=Digi-Key, Features="Moisture Resistant", Height=0.01inch, Length=0.024inch, Manufacturer Part Number=RC0201JR-071M1L, Number of Terminations=2, Packaging="Tape and Reel", Pricing 1="1=0.10000, 10=0.02800, 100=0.01140, 1000=0.00513, 2500=0.00445, 5000=0.00368 (USD)", RoHS=Yes, RoHS Compliant=Yes, Stock 1=9936, Supplier 1=Digi-Key, Width=0.012inch
R77 R78 R79 R80: library part TNPW020150R0DEED, "TNPW0201 50R 0.5% T-9 ET7 E3", Manufacturer="Vishay Dale", Supplier Part Number 1=MP9403EN-LF-ND, Manufacturer Part Number=TNPW020150R0DEED, RoHS=Yes, Supplier 1=Digi-Key
R85 R86 R87 R88 R90 R92 R94 R96 R98 R100 R102 R104 R105 R106 R107 R108 R109 R110 R111 R112 R113 R114 R115 R116 R118 R120 R121 R122 R123 R124 R125: library part AC0201FR-0722RL, "RES SMD 22 OHM 1% 1/20W 0201", Case Code (Imperial)=0201, Case Code (Metric)=0603, Manufacturer=Yageo, Max Operating Temperature=155°C, Max Power Dissipation=50mW, Min Operating Temperature=-55°C, Resistor Type="Thick Film", Supplier Part Number 1=YAG3420CT-ND, Temperature Coefficient=200ppm/°C, Tolerance=1%, Case/Package=0201, Category="Chip SMD Resistors", ComponentLink1Description=http://www.yageo.com/NewPortal/yageodocoutput?fileName=/pdf/R-Chip/PYu-AC_51_RoHS_L_6.pdf&src-supplier=Digi-Key, ComponentLink1URL=http://www.yageo.com/NewPortal/yageodocoutput?fileName=/pdf/R-Chip/PYu-AC_51_RoHS_L_6.pdf&src-supplier=Digi-Key, Features="Moisture Resistant,Automotive AEC-Q200", Height=0.01inch, Length=0.024inch, Manufacturer Part Number=AC0201FR-0722RL, Number of Terminations=2, Packaging="Tape and Reel", Pricing 1="1=0.10000, 10=0.06300, 100=0.02560, 1000=0.01149, 2500=0.00997, 5000=0.00823 (USD)", Resistance=22R, RoHS=Yes, RoHS Compliant=Yes, Stock 1=35550, Supplier 1=Digi-Key, Width=0.012inch
R126: library part RMCF0201FT402K, "RES 402K OHM 1% 1/20W 0201", Case Code (Imperial)=0201, Case Code (Metric)=0603, Manufacturer="Stackpole Electronics", Max Operating Temperature=125°C, Max Power Dissipation=50mW, Min Operating Temperature=-55°C, Resistance=402kR, Resistor Type="Thick Film", Supplier Part Number 1=RMCF0201FT402KCT-ND, Temperature Coefficient=200ppm/°C, Tolerance=1%, Case/Package=0201, Category="Chip SMD Resistors", ComponentLink1Description=https://www.seielect.com/catalog/SEI-RMCF_RMCP.pdf?src-supplier=Avnet, ComponentLink1URL=https://www.seielect.com/catalog/SEI-RMCF_RMCP.pdf?src-supplier=Avnet, ComponentLink2Description=https://www.seielect.com/Catalog/SEI-RMCF_RMCP.pdf?src-supplier=Digi-Key, ComponentLink2URL=https://www.seielect.com/Catalog/SEI-RMCF_RMCP.pdf?src-supplier=Digi-Key, Contact Plating=Tin,Matte, Height=0.009inch, Length=0.024inch, Manufacturer Part Number=RMCF0201FT402K, Mount="Surface Mount", Number of Terminations=2, Packaging="Tape and Reel", Pricing 1="1=0.10000, 10=0.02700, 100=0.01090, 1000=0.00488, 2500=0.00423, 5000=0.00350 (USD)", Radiation Hardening=No, RoHS=Yes, RoHS Compliant=Yes, Series=RMCF, Stock 1=4361, Supplier 1=Digi-Key, Width=0.012inch
R127: library part RC0201FR-07270KL, "RES SMD 270K OHM 1% 1/20W 0201", Case Code (Imperial)=0201, Case Code (Metric)=0603, Manufacturer=Yageo, Max Operating Temperature=125°C, Max Power Dissipation=50mW, Min Operating Temperature=-55°C, Resistance=270kR, Resistance Tolerance=1%, Resistor Type="Thick Film", Supplier Part Number 1=YAG2548CT-ND, Temperature Coefficient=200ppm/°C, Voltage Rating=25V, Case/Package=0201, Category="Chip SMD Resistors", ComponentLink1Description=https://datasheet.ciiva.com/7672/1563626-7672216.pdf?src-supplier=Element14, ComponentLink1URL=https://datasheet.ciiva.com/7672/1563626-7672216.pdf?src-supplier=Element14, Features="Moisture Resistant", Height=0.01inch, Length=0.024inch, Manufacturer Part Number=RC0201FR-07270KL, Number of Terminations=2, Packaging="Tape and Reel", Power Rating=50mW, Pricing 1="1=0.10000, 10=0.04200, 100=0.01700, 1000=0.00765, 2500=0.00664, 5000=0.00548 (USD)", REACH SVHC=Unknown, RoHS=Yes, RoHS Compliant=Yes, Series=RC, Stock 1=96171, Supplier 1=Digi-Key, Termination=SMD/SMT, Tolerance=1%, Width=0.012inch
R129: library part RC0201FR-07536KL, "RES SMD 536K OHM 1% 1/20W 0201", Case Code (Imperial)=0201, Case Code (Metric)=0603, Manufacturer=Yageo, Max Operating Temperature=125°C, Max Power Dissipation=50mW, Min Operating Temperature=-55°C, Resistance=536kR, Resistor Type="Thick Film", Supplier Part Number 1=YAG2720CT-ND, Temperature Coefficient=200ppm/°C, Tolerance=1%, Case/Package=0201, Category="Chip SMD Resistors", ComponentLink1Description=http://www.yageo.com.tw/exep/pages/download/literatures/PYu-R_INT-thick_7.pdf?src-supplier=Digi-Key, ComponentLink1URL=http://www.yageo.com.tw/exep/pages/download/literatures/PYu-R_INT-thick_7.pdf?src-supplier=Digi-Key, ComponentLink2Description=http://www.yageo.com/documents/recent/PYu-RC_Group_51_RoHS_L_9.pdf?src-supplier=Digi-Key, ComponentLink2URL=http://www.yageo.com/documents/recent/PYu-RC_Group_51_RoHS_L_9.pdf?src-supplier=Digi-Key, Features="Moisture Resistant", Height=0.01inch, Length=0.024inch, Manufacturer Part Number=RC0201FR-07536KL, Number of Terminations=2, Packaging="Tape and Reel", Pricing 1="1=0.10000, 10=0.04000, 100=0.01630, 1000=0.00732, 2500=0.00635, 5000=0.00525 (USD)", RoHS=Yes, RoHS Compliant=Yes, Stock 1=8842, Supplier 1=Digi-Key, Width=0.012inch
SB1 SB2 SB3 SB4 SB9 SB10: "Solder Bridge ON"
SW1 SW2 SW3 SW4 SW5 SW6: library part TL3301NF160QG/TR, "SWITCH TACTILE SPST-NO 0.05A 12V", Manufacturer=E-Switch, Package="SMD (6.00mm x 6.00mm)", Manufacturer Part No=TL3301NF160QG/TR
U1: "Single I2S/PCM Interface, Stereo, 2.3W Mono Amp, 45mW Headphone Amp", Manufacturer=Realtek, Manufacturer Part No=ALC5621-GR, Package=QFN-32
U2 U11: "IC REG LINEAR 1.8V 250MA SOT23-3", Manufacturer=ABLIC, Supplier Part Number 1=1662-1438-1-ND, Manufacturer Part Number=S-1206B18-M3T1U, Pricing 1="1=0.92000, 10=0.80800, 25=0.75960, 100=0.57580, 250=0.49000, 500=0.46550 (USD)", Stock 1=577, Supplier 1=Digi-Key
U3: "RF Components", Package=None, Availability=Unavailable, MF=Simcom, MP="SIM7100A S2-10671", Price=None, SnapEDA_Link=https://www.snapeda.com/parts/SIM7100A%20S2-10671/SIMcom%20Wireless%20solutions%20Co.%2CLtd/view-part/796159/?ref=snap
U4: "S5P4418 Quad Core Android SoM System on Module", Manufacturer=Samsung, Package=Custom, Manufacturer Part No=S5P4418
U5: "MOTION SENSOR", Manufacturer="TDK InvenSense", Category="Inertial Measurement Units (IMUs)", Manufacturer Part Number=ICM-42688-P, Pricing 1="5000=3.04110 (USD)", RoHS=No, Stock 1=5000, Supplier 1="Arrow Electronics", Supplier Part Number 1=ICM-42688-P
U6: "SENSOR OPT 550NM AMBIENT 6SMD", Case/Package=SMD/SMT, Manufacturer="Vishay Semiconductors", Max Operating Temperature=85°C, Min Operating Temperature=-25°C, Supplier Part Number 1=VEML6030-GS15CT-ND, Category=Sensors, ComponentLink1Description=http://www.vishay.com/docs/84366/veml6030.pdf?src-supplier=Digi-Key, ComponentLink1URL=http://www.vishay.com/docs/84366/veml6030.pdf?src-supplier=Digi-Key, Manufacturer Part Number=VEML6030-GS15, Mount="Surface Mount", Output Type=I2C, Packaging="Tape and Reel", Pricing 1="1=2.00000, 5=1.89000, 10=1.62000, 25=1.29600, 50=1.18800, 100=1.08000, 500=0.94500, 1000=0.83700, 5000=0.78300 (USD)", RoHS=Yes, RoHS Compliant=Yes, Stock 1=1250, Supplier 1=Digi-Key, Wavelength=550nm
U9: "SOT-23-5 PMIC - Power Distribution Switches RoHS", Manufacturer="Silergy Corp", Package=SOT-23-5, Manufacturer Part No=SY6280AAC
U10: "USB 2.0 Hub Controller"
U12: "IC TRANSCEIVER FULL 2/2 20TSSOP", Manufacturer=MaxLinear, Supplier Part Number 1=1016-1794-1-ND, Category="Interface ICs", Manufacturer Part Number=SP3222EEY-L/TR, Pricing 1="1=1.75000, 10=1.57600, 25=1.48680, 100=1.26660, 250=1.18932, 500=1.04066, 1000=0.86226 (USD)", RoHS=Yes, RoHS Compliant=Yes, Stock 1=1669, Supplier 1=Digi-Key
U13: Manufacturer=ZUCZUG, Package=QFN-8, Manufacturer Part No=ETA3451D2I-T
U14: "IC REG BOOST ADJ 2.7A TSOT23-6", Case/Package=SOT-23-6, Manufacturer="Monolithic Power Systems", Max Input Voltage=6V, Max Operating Temperature=125°C, Max Output Current=2.7A, Min Input Voltage=2.5V, Min Operating Temperature=-40°C, Min Output Voltage=3V, Operating Supply Current=270uA, Package Quantity=3000, Supplier Part Number 1=1589-1909-1-ND, Switching Frequency=1.2MHz, Category="Voltage Regulators - Switching", ComponentLink1Description=http://www.mouser.com/ds/2/277/MP3221_r1.0-371792.pdf?src-supplier=Mouser, ComponentLink1URL=http://www.mouser.com/ds/2/277/MP3221_r1.0-371792.pdf?src-supplier=Mouser, ComponentLink2Description=https://www.monolithicpower.com/Lists/Product_NonSynchronous%20Switcher_5745/DispForm.aspx?ID=24&src-supplier=Avnet, ComponentLink2URL=https://www.monolithicpower.com/Lists/Product_NonSynchronous%20Switcher_5745/DispForm.aspx?ID=24&src-supplier=Avnet, ComponentLink3Description=https://www.monolithicpower.com/Lists/Product_NonSynchronous%20Switcher_5745/DispForm.aspx?ID=24&src-supplier=Avnet+Asia, ComponentLink3URL=https://www.monolithicpower.com/Lists/Product_NonSynchronous%20Switcher_5745/DispForm.aspx?ID=24&src-supplier=Avnet+Asia, ComponentLink4Description=http://www.monolithicpower.com/DesktopModules/DocumentManage/API/Document/getDocument?id=891&src-supplier=Digi-Key, ComponentLink4URL=http://www.monolithicpower.com/DesktopModules/DocumentManage/API/Document/getDocument?id=891&src-supplier=Digi-Key, Lead Free="Lead Free", Manufacturer Part Number=MP3221GJ-Z, Max Output Voltage=6V, Min Supply Voltage=2.5V, Mount="Surface Mount", Number of Outputs=1, Number of Pins=6, Operating Supply Voltage=6V, Output Configuration=Positive, Output Current=2.7A, Output Type=Adjustable, Output Voltage=6V, Packaging="Tape and Reel", Pricing 1="1=1.97000, 10=1.77000, 25=1.66960, 100=1.33560, 250=1.16864, 500=1.13526, 1000=0.90153 (USD)", Radiation Hardening=No, RoHS=Yes, RoHS Compliant=Yes, Stock 1=2434, Supplier 1=Digi-Key, Synchronous Rectifier=No, Topology=Boost
X1: "CRYSTAL 12.0000MHZ 18PF SMD", Case/Package=SMD/SMT, ESR (Equivalent Series Resistance)=150R, Frequency=12MHz, Frequency Stability=30ppm, Load Capacitance=18pF, Manufacturer=TXC, Max Operating Temperature=70°C, Min Operating Temperature=-20°C, Package Quantity=1, Supplier Part Number 1=717-8Z-12.000MAAJ-T, Category=Crystals, ComponentLink1Description=https://datasheet.ciiva.com/28498/1838674-28498900.pdf?src-supplier=Element14, ComponentLink1URL=https://datasheet.ciiva.com/28498/1838674-28498900.pdf?src-supplier=Element14, ComponentLink2Description=https://datasheet.ciiva.com/4950/8z-12784-4950167.pdf?src-supplier=Mouser, ComponentLink2URL=https://datasheet.ciiva.com/4950/8z-12784-4950167.pdf?src-supplier=Mouser, ComponentLink3Description=https://datasheet.ciiva.com/859/8z-859073.pdf?src-supplier=Digi-Key, ComponentLink3URL=https://datasheet.ciiva.com/859/8z-859073.pdf?src-supplier=Digi-Key, ComponentLink4Description=https://datasheet.ciiva.com/859/8z-859071.pdf?src-supplier=Digi-Key, ComponentLink4URL=https://datasheet.ciiva.com/859/8z-859071.pdf?src-supplier=Digi-Key, ComponentLink5Description=https://datasheet.ciiva.com/859/8z-859072.pdf?src-supplier=Digi-Key, ComponentLink5URL=https://datasheet.ciiva.com/859/8z-859072.pdf?src-supplier=Digi-Key, ComponentLink6Description=https://datasheet.ciiva.com/8047/1041872-8047871.pdf?src-supplier=Element14, ComponentLink6URL=https://datasheet.ciiva.com/8047/1041872-8047871.pdf?src-supplier=Element14, Depth=2mm, Frequency Tolerance=30ppm, Height=0.022inch, Length=2.5mm, Manufacturer Part Number=8Z-12.000MAAJ-T, Mount="Surface Mount", Number of Pins=4, Packaging="Tape and Reel", Pricing 1="1=1.41000, 10=1.36000, 50=1.33000, 100=1.13000, 1000=0.93000, 10000=0.78000 (USD)", REACH SVHC="No SVHC", RoHS=Yes, RoHS Compliant=Yes, Series=8Z, Stock 1=33, Supplier 1=Mouser, Termination=SMD/SMT, Tolerance=30ppm, Width=0.079inch

## Free pads (board coordinates)
  round 4 hole 3 unplated: MH0(2.5,2.5) MH0(2.5,97.5) MH0(137.5,97.5) MH0(137.5,2.5)

## Nets (pads, with @x,y where several pads share a name; then routed paths per layer and width w, separated by ;. In a path a pad name is that pad's centre, name@x,y a point inside that pad or via, vN(x,y) a via of type N, cw(c..) or ccw(c..) an arc to the next point about the centre after c; other vN are vias at no path point)
5V_IN: C49.1 C50.1 D6.1 J6.1 SB1.2
232RXD1: J19.1 U12.16
232TXD1: J18.2 U12.17
BAT: D2.1 J26.1
CAM_1.8V: C31.1 C32.1 J3.11 R24.2 U4.59
CAM_2.8V: C29.1 C30.1 J3.4 U4.58
CAM_CLK: J3.17 U4.130
CAM_D0: J3.19 U4.131
CAM_D1: J3.21 U4.132
CAM_D2: J3.22 U4.133
CAM_D3: J3.20 U4.134
CAM_D4: J3.18 U4.135
CAM_D5: J3.16 U4.136
CAM_D6: J3.14 U4.137
CAM_D7: J3.12 U4.138
CAM_H: J3.9 U4.128
CAM_PD: J3.8 U4.139
CAM_PN: J3.24 R27.2 U4.141
CAM_RST: J3.6 U4.140
CAM_SIG.CAM_V: J3.7 U4.129
DC5V_OTG: C58.1 C59.1 J21.1 U4.17 U9.1
DCIN: SB1.1 U4.55 U4.56
FB: C86.2 R126.1 R127.1 U13.4
GATE1: C40.1 Q5.3 Q6.1 R133.1
GATE2: Q3.1 Q4.3 R18.1
GND: C1.2 C2.2 C3.2 C4.2 C5.2 C6.2 C7.2 C8.1 C9.2 C10.1 C13.2 C14.2 C15.2 C21.2 C22.2 C23.2 C24.2 C25.2 C26.2 C27.1 C28.2 C29.2 C30.2 C31.2 C32.2 C33.1 C34.1 C35.1 C36.1 C37.1 C38.1 C39.1 C49.2 C50.2 C51.2 C52.2 C53.2 C54.2 C55.2 C56.2 C57.2 C58.2 C59.2 C60.2 C61.2 C62.2 C63.2 C64.2 C65.1 C66.1 C77.2 C78.2 C80.2 C81.2 C83.2 C84.2 C85.2 C87.2 C88.2 C89.2 C90.2 C91.2 D3.2 D6.2 D7.2 D9.2 D10.2 D11.2 J2.1 J3.2 J3.15 J3.MP1 J3.MP2 J6.3 J7.1 J8.2 J9.6 J9.MP1 J9.MP2 J9.MP3 J9.MP4 J10.6 J10.MP1 J10.MP2 J10.MP3 J10.MP4 J12.4 J13.4 J14.4 J15.C5 J15.MP1 J15.MP2 J15.MP3 J15.MP4 J15.MP5 J15.MP6 J17.2 J19.2 J20.3 J20.29 J20.36 J20.41 J20.42 J21.5 J22.2 J22.3 J23.2 J23.3 J26.2 Q1.2 Q2.2 Q4.2 Q5.2 Q7.2 R3.2 R7.1 R11.2 R16.2 R19.2 R23.1 R66.2 R68.2 R70.1 R71.1 R75.2 R97.2 R99.2 R101.2 R103.2 R127.2 R130.1 R132.2 R135.2 SW1.1 SW2.1 SW3.1 SW4.1 SW5.1 SW6.1 U1.12 U1.24 U1.28 U1.33 U2.2 U3.1 U3.2 U3.5 U3.10 U3.14 U3.37 U3.40 U3.41 U3.43 U3.57 U3.58 U3.60 U3.61 U3.64 U3.65 U3.77 U3.78 U3.80 U4.51 U4.52 U4.90 U4.101 U4.184 U5.1 U5.6 U5.7 U5.11 U6.1 U6.4 U9.2 U10.15 U11.2 U12.1 U12.18 U13.2 U13.3 U13.9 U14.2 X1.2 X1.4
GNSS_ANT: J23.1 U3.79
GPIO.GPIOA29: R29.2 U4.166
GPIO.GPIOB10: R37.2 U4.164
GPIOB8: R22.1 U4.163
GPIOC7: R21.1 U4.162
GPIOC11: R20.1 U4.165
HP_OUT_L: C11.1 U1.30
HP_OUT_R: C12.1 U1.29
HUB_DM1: D10.1 U3.12 U10.27
HUB_DM2: J12.2 U10.2
HUB_DM3: J13.2 U10.8
HUB_DM4: J14.2 U10.11
HUB_DP1: D11.1 U3.13 U10.28
HUB_DP2: J12.3 U10.3
HUB_DP3: J13.3 U10.9
HUB_DP4: J14.3 U10.12
L_DCLK: J20.30 R119.1
LCD_B0: R97.1 R109.2 U4.35
LCD_B1: R99.1 R110.2 U4.36
LCD_B2: R101.1 R111.2 U4.37
LCD_B3: R89.1 R112.2 U4.38
LCD_B4: R91.1 R113.2 U4.39
LCD_B5: R93.1 R114.2 U4.40
LCD_B6: R103.1 R115.2 U4.41
LCD_B7: R95.1 R116.2 U4.42
LCD_CLK: C83.1 R119.2 U4.46
LCD_DE: R117.2 U4.43
LCD_G0: R98.2 U4.27
LCD_G1: R100.2 U4.28
LCD_G2: R102.2 U4.29
LCD_G3: R104.2 U4.30
LCD_G4: R105.2 U4.31
LCD_G5: R106.2 U4.32
LCD_G6: R107.2 U4.33
LCD_G7: R108.2 U4.34
LCD_HSYNC: R120.2 U4.44
LCD_R0: R85.2 U4.19
LCD_R1: R86.2 U4.20
LCD_R2: R87.2 U4.21
LCD_R3: R88.2 U4.22
LCD_R4: R90.2 U4.23
LCD_R5: R92.2 U4.24
LCD_R6: R94.2 U4.25
LCD_R7: R96.2 U4.26
LCD_SIG.LCD_VSYNC: R121.2 U4.45
LVDS_VDD: C5.1 C6.1 C89.1 J18.1 L6.2 Q6.3 R128.2 U1.26 U14.5
MAIN_ANT: J22.1 U3.82
MCU_BACKLIGHT_PWM: J20.1 U4.2
MCU_CAM1_MCLK: J3.13 U4.142
MCU_HP_DET: R9.2 U4.127
MCU_I2C.MCU_SCL_0: R4.1 R25.2 U4.78
MCU_I2C.MCU_SDA_0: R5.1 R26.2 U4.79
MCU_I2S.MCU_I2S_BCK: U1.8 U4.123
MCU_I2S.MCU_I2S_LRCK: U1.7 U4.126
MCU_I2S.MCU_I2S_MCLK: U1.11 U4.122
MCU_I2S.MCU_I2S_SDIN: U1.9 U4.124
MCU_I2S.MCU_I2S_SDOUT: U1.10 U4.125
MCU_KEY.MCU_KEY_VOLDN: R35.2 U4.156
MCU_KEY.MCU_KEY_VOLUP: R32.2 U4.157
MCU_KEY.MCU_PWR_KEY: C34.2 R33.2 U4.160
MCU_KEY.MCU_RESETIN: R30.2 U4.159
MCU_NRESETOUT: R124.2 U4.4
MCU_OTG_PWRON: R67.2 U4.14
MCU_PWREN_SYS: U4.57 U13.1
MCU_SCL_1: R122.2 U4.9
MCU_SCL_2: R40.1 U4.7 U5.13 U6.5
MCU_SD0.MCU_SD0_CD: "J9.*CD Switch" U4.177
MCU_SD0.MCU_SD0_CLK: R60.1 U4.183
MCU_SD0.MCU_SD0_CMD: J9.3 U4.182
MCU_SD0.MCU_SD0_D0: J9.7 R61.8 U4.181
MCU_SD0.MCU_SD0_D1: J9.8 R61.7 U4.180
MCU_SD0.MCU_SD0_D2: J9.1 R61.6 U4.179
MCU_SD0.MCU_SD0_D3: J9.2 R61.5 U4.178
MCU_SD1.MCU_SD1_CD: "J10.*CD Switch" U4.170
MCU_SD1.MCU_SD1_CLK: R62.1 U4.171
MCU_SD1.MCU_SD1_CMD: J10.3 U4.172
MCU_SD1.MCU_SD1_D0: J10.7 R63.8 U4.173
MCU_SD1.MCU_SD1_D1: J10.8 R63.7 U4.174
MCU_SD1.MCU_SD1_D2: J10.1 R63.6 U4.175
MCU_SD1.MCU_SD1_D3: J10.2 R63.5 U4.176
MCU_SDA_1: R123.2 U4.8
MCU_SDA_2: R38.1 U4.6 U5.14 U6.2
MCU_SEN0_INT: R82.1 U4.158
MCU_TOUCH_INT: R125.2 U4.3
MCU_USB+: J21.3 U4.16
MCU_USB-: J21.2 J21.4 U4.15 U4.18
MCU_USB_HOST.MCU_USB_HOST_D+: U4.13 U10.26
MCU_USB_HOST.MCU_USB_HOST_D-: U4.12 U10.25
MCU_VG_EN: R118.2 U4.5
MIC1N: MK1.2 R3.1 U1.2
MIC1P: C2.1 MK1.1 R1.1 U1.1
MICBIAS: R2.1 U1.32
MICBIAS#: C1.1 R1.2 R2.2
NetC7_1: C7.1 C9.1 U1.27
NetC8_2: C8.2 U1.19
NetC10_2: C10.2 U1.20
NetC11_2: C11.2 J2.5 R9.1
NetC12_2: C12.2 J2.4 J2.6
NetC33_2: C33.2 R30.1 SW2.3
NetC38_2: C38.2 C39.2 R39.1 U6.6
NetC60_1: C60.1 R69.2 R70.2 U10.13
NetC79_1: C79.1 U12.4
NetC79_2: C79.2 U12.2
NetC80_1: C80.1 U12.3
NetC81_1: C81.1 U12.7
NetC82_1: C82.1 U12.6
NetC82_2: C82.2 U12.5
NetD4_2: D4.2 R14.2
NetD12_2: D12.2 L6.1 U14.1
NetJ2_2: J2.2 R8.1
NetJ3_1: J3.1 R27.1
NetJ3_3: J3.3 R26.1
NetJ3_5: J3.5 R25.1
NetJ3_10: J3.10 R24.1
NetJ7_4: J7.4 SB2.2
NetJ8_1: J8.1 SB3.2
NetJ9_5: J9.5 R60.2
NetJ10_5: J10.5 R62.2
NetJ20_5: J20.5 R85.1
NetJ20_6: J20.6 R86.1
NetJ20_7: J20.7 R87.1
NetJ20_8: J20.8 R88.1
NetJ20_9: J20.9 R90.1
NetJ20_10: J20.10 R92.1
NetJ20_11: J20.11 R94.1
NetJ20_12: J20.12 R96.1
NetJ20_13: J20.13 R98.1
NetJ20_14: J20.14 R100.1
NetJ20_15: J20.15 R102.1
NetJ20_16: J20.16 R104.1
NetJ20_17: J20.17 R105.1
NetJ20_18: J20.18 R106.1
NetJ20_19: J20.19 R107.1
NetJ20_20: J20.20 R108.1
NetJ20_21: J20.21 R109.1
NetJ20_22: J20.22 R110.1
NetJ20_23: J20.23 R111.1
NetJ20_24: J20.24 R112.1
NetJ20_25: J20.25 R113.1
NetJ20_26: J20.26 R114.1
NetJ20_27: J20.27 R115.1
NetJ20_28: J20.28 R116.1
NetJ20_31: J20.31 R118.1
NetJ20_32: J20.32 R120.1
NetJ20_33: J20.33 R121.1
NetJ20_34: J20.34 R117.1
NetJ20_37: J20.37 R122.1
NetJ20_38: J20.38 R123.1
NetJ20_39: J20.39 R124.1
NetJ20_40: J20.40 R125.1
NetL5_1: L5.1 U13.7
NetL5_2: L5.2 SB4.1
NetLED1_2: LED1.2 R20.2
NetLED2_2: LED2.2 R21.2
NetLED3_2: LED3.2 R22.2
NetLED4_2: LED4.2 R23.2
NetLED5_2: LED5.2 R82.2
NETLIGHT: R15.2 U3.51
NetP1_1: P1.1 U3.85
NetP2_1: P2.1 U3.87
NetQ1_1: Q1.1 R11.1 R13.1
NetQ2_1: Q2.1 R15.1 R16.1
NetQ2_3: Q2.3 R14.1
NetQ4_1: Q4.1 R17.1 R19.1
NetQ5_1: Q5.1 R131.1 R132.1
NetQ7_1: Q7.1 R134.1 R135.1
NetR4_2: R4.2 U1.16
NetR5_2: R5.2 U1.17
NetR6_1: R6.1 U1.31
NetR7_2: R7.2 U1.18
NetR13_2: R13.2 SB9.2
NetR28_1: R28.1 R29.1 SW1.3
NetR31_1: R31.1 R32.1 SW3.3
NetR33_1: R33.1 SW4.3
NetR34_1: R34.1 R35.1 SW5.3
NetR36_1: R36.1 R37.1 SW6.3
NetR66_1: R66.1 U9.3
NetR67_1: R67.1 R68.1 U9.4
NetR71_2: R71.2 U10.4
NetR72_1: R72.1 U10.17
NetR73_1: R73.1 U10.18
NetR74_1: R74.1 R75.1 U10.21
NetR77_2: R77.2 U3.17
NetR78_2: R78.2 U3.18
NetR79_2: R79.2 U3.19
NetR80_2: R80.2 U3.20
NetR83_2: R83.2 U12.8
NetR84_1: R84.1 U12.9
NetR128_1: R128.1 U14.4
NetR129_2: R129.2 R130.2 U14.3
NetR134_2: R134.2 SB10.2
PC_RXD1: J25.3 R84.2
PC_TXD1: J25.2 R83.1
PWR_ON: P3.1 SB9.1
PWR_ON#: C15.1 D3.1 Q1.3 U3.3
RESET: P4.1 SB10.1
RESET#: Q7.3 U3.4
SPKR_LN: J1.2 U1.25
SPKR_LP: J1.1 U1.23
UART_SIG.UARTRXD0: U4.149 U12.10
UART_SIG.UARTRXD1: U4.147 U12.15
UART_SIG.UARTRXD3: J16.2 U4.143
UART_SIG.UARTTXD0: U4.150 U12.12
UART_SIG.UARTTXD1: U4.148 U12.13
UART_SIG.UARTTXD3: J17.1 U4.144
USIM_CLK: D7.5 J15.C3 R79.1
USIM_DATA: D7.4 J15.C7 R77.1
USIM_RST: D7.6 J15.C2 R78.1
USIM_VDD: D7.1 J15.C1 R80.1
V33_HUB: C63.1 C64.1 R73.2 U10.1 U10.5 U10.10 U10.16 U10.24
VBAT: C21.1 C22.1 C23.1 C24.1 C25.1 C26.1 C51.1 C52.1 D4.1 J7.3 J20.2 Q3.3 R18.2 SB2.1 SB3.1 U3.38 U3.39 U3.62 U3.63 U4.49 U4.50
VBAT_SYS: C40.2 C84.1 C85.1 D1.1 Q6.2 R133.2 U4.53 U4.54 U13.8
VBAT_SYS#: C13.1 D1.2 D2.2 U2.1
VBAT_USB: C57.1 C61.1 C62.1 C90.1 C91.1 D9.1 D12.1 J12.1 J13.1 J14.1 R69.1 R72.2 R74.2 R81.2 R129.1 U9.5 U10.23
VBAT_USB1: R81.1 U3.11
VCC1P0_CORE_DC: C86.1 C87.1 C88.1 R126.2 SB4.2 U4.47 U4.48 U13.5
VCC3P3_SYS: C3.1 C4.1 C28.1 C53.1 C54.1 C55.1 C56.1 C77.1 J9.4 J10.4 J16.1 J20.4 LED1.1 LED2.1 LED3.1 LED4.1 LED5.1 R6.2 R8.2 R17.2 R28.2 R31.2 R34.2 R36.2 R38.2 R39.2 R40.2 R61.1 R61.2 R61.3 R61.4 R63.1 R63.2 R63.3 R63.4 R89.2 R91.2 R93.2 R95.2 R131.2 U1.13 U1.14 U4.1 U11.1 U12.19 U12.20
VCC3P8SIM: C27.2 Q3.2
"VCC 1P8_LDO": C35.2 C36.2 C37.2 C78.1 U5.5 U5.8 U5.12 U11.3
"VCC 1P8_RTC": C14.1 U2.3 U4.169
XTAL1: C66.2 R76.1 U10.6 X1.1
XTAL2: C65.2 R76.2 U10.7 X1.3
pads on no net: "J9.#CD Switch" "J10.#CD Switch" D7.3 J2.3 J3.23 J6.2 J6.MH1 J6.MH2 J7.2 J7.MP1 J7.MP2 J12.MH1 J12.MH2 J13.MH1 J13.MH2 J14.MH1 J14.MH2 J15.C6 J20.35 J20.MP1 J20.MP2 J21.MH1 J21.MH2 J21.MH3 J21.MH4 J25.1 J25.4 J25.5 J25.6 J25.7 J25.8 J25.9 J25.MH1 J25.MH2 SW1.2 SW1.4 SW2.2 SW2.4 SW3.2 SW3.4 SW4.2 SW4.4 SW5.2 SW5.4 SW6.2 SW6.4 U1.3 U1.4 U1.5 U1.6 U1.15 U1.21 U1.22 U3.6 U3.7 U3.8 U3.9 U3.15 U3.16 U3.21 U3.22 U3.23 U3.24 U3.25 U3.26 U3.27 U3.28 U3.29 U3.30 U3.31 U3.32 U3.33 U3.34 U3.35 U3.36 U3.42 U3.44 U3.45 U3.46 U3.47 U3.48 U3.49 U3.50 U3.52 U3.53 U3.54 U3.55 U3.56 U3.59 U3.66 U3.67 U3.68 U3.69 U3.70 U3.71 U3.72 U3.73 U3.74 U3.75 U3.76 U3.81 U3.83 U3.84 U3.86 U4.10 U4.11 U4.60 U4.61 U4.62 U4.63 U4.64 U4.65 U4.66 U4.67 U4.68 U4.69 U4.70 U4.71 U4.72 U4.73 U4.74 U4.75 U4.76 U4.77 U4.80 U4.81 U4.82 U4.83 U4.84 U4.85 U4.86 U4.87 U4.88 U4.89 U4.91 U4.92 U4.93 U4.94 U4.95 U4.96 U4.97 U4.98 U4.99 U4.100 U4.102 U4.103 U4.104 U4.105 U4.106 U4.107 U4.108 U4.109 U4.110 U4.111 U4.112 U4.113 U4.114 U4.115 U4.116 U4.117 U4.118 U4.119 U4.120 U4.121 U4.145 U4.146 U4.151 U4.152 U4.153 U4.154 U4.155 U4.161 U4.167 U4.168 U5.2 U5.3 U5.4 U5.9 U5.10 U6.3 U10.14 U10.19 U10.20 U10.22 U12.11 U12.14 U13.6 U14.6

## Silkscreen, mask and mechanical layers (free items; w line width, h text height)
Top Overlay:
  text "PWR" at 131.84,71.764 h2 r90
  text "RESET" at 120.664,71.742 h2 r90
  text "CAMERA" at 134.38,38.978 h2 r90
  text "LCD" at 134.38,15.521 h2 r90
Board Outline:
  the board outline again, w0.254